# Altium PCB 16MV1.PcbDoc (part 2 of 3)
Units mm, origin at the board's own origin, x right, y up, seen from the top; angles counter-clockwise.
Board outline 48 x 32 mm, 4 copper layers (Top Layer, Layer 1, Layer 2, Bottom Layer), stack 1.583 mm thick; 197 components, 152 nets, 778 pads, 395 vias.
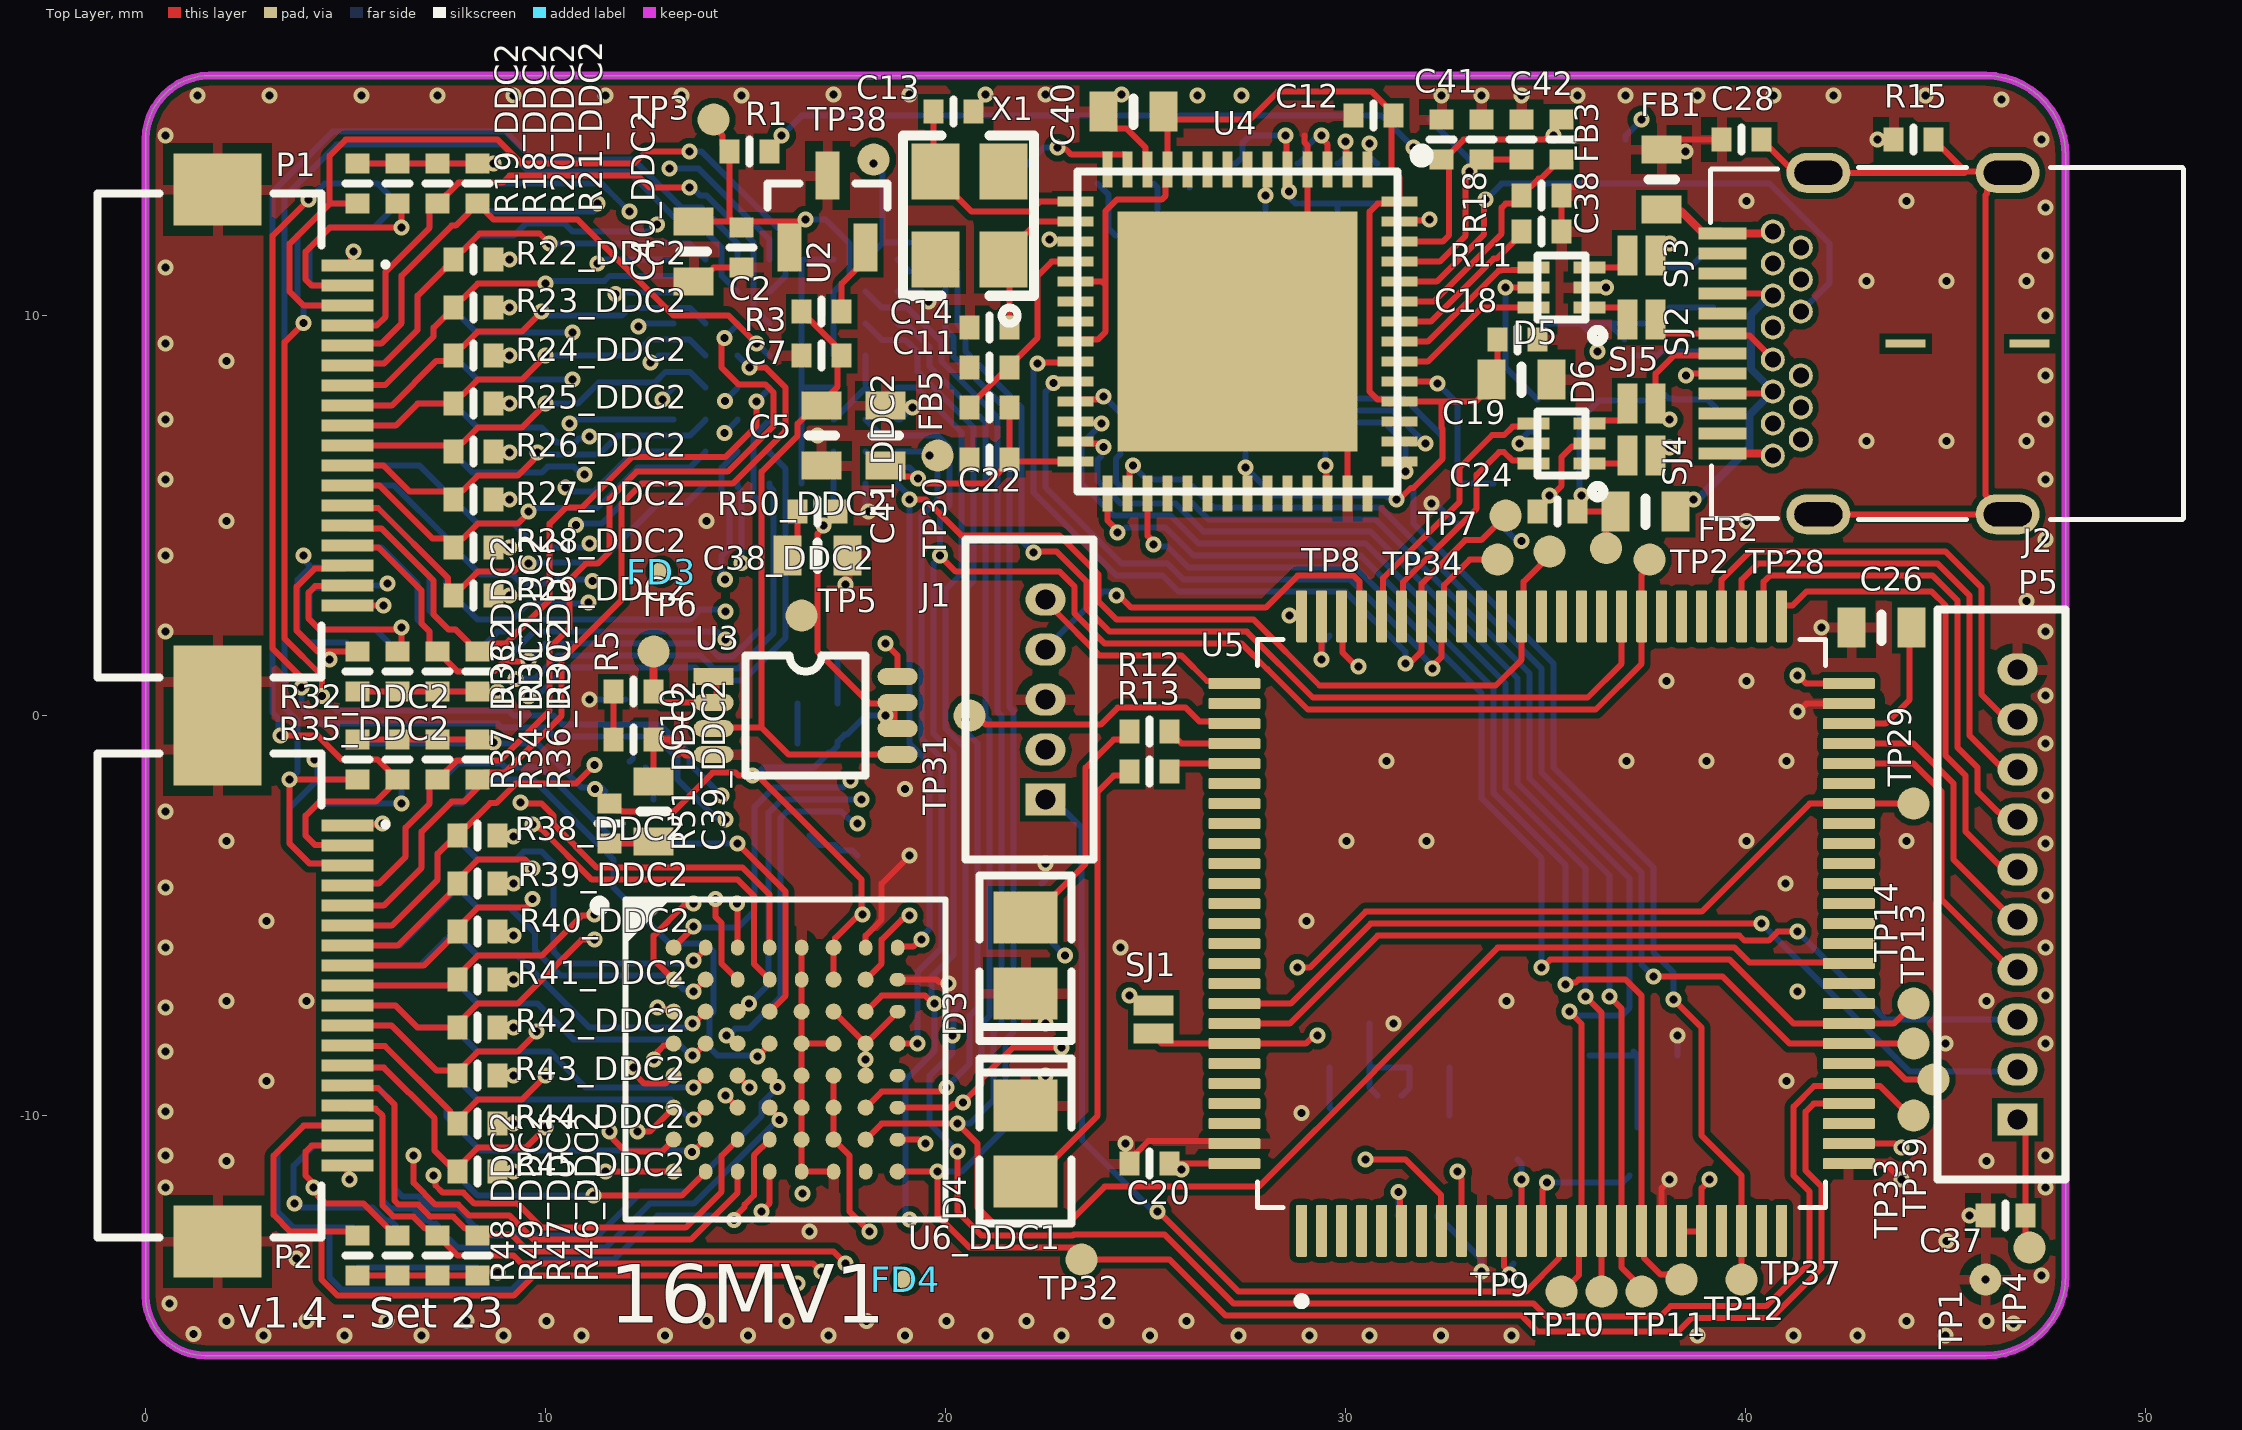
[diagram p0: Top Layer view]

## Via types
v1: diameter 0.4, hole 0.2, Top Layer to Bottom Layer, tented both sides, 395 vias

## Nets (pads, with @x,y where several pads share a name; then routed paths per layer and width w, separated by ;. In a path a pad name is that pad's centre, name@x,y a point inside that pad or via, vN(x,y) a via of type N, cw(c..) or ccw(c..) an arc to the next point about the centre after c; other vN are vias at no path point) (continued)
GND: (continued)
  other v1: 2.946,-15.5 4.975,-15.5 6.9,-15.5 8.952,-15.5 10.9,-15.5 12.987,-15.5 15.054,-15.5 17.076,-15.5 18.982,-15.5 21.001,-15.5 22.9,-15.5 25.113,-15.5 27.324,-15.5 29.102,-15.5 30.6,-15.5 32.381,-15.5 34.15,-15.5 38.8,-15.5 41.2,-15.5 42.8,-15.5 45,-15.5 1.198,-15.456 46.7,-15.2 2.028,-15.14 4.028,-15.14 6.028,-15.14 8.028,-15.14 10.028,-15.14 14.028,-15.14 16.028,-15.14 18.028,-15.14 20.028,-15.14 22.028,-15.14 24.028,-15.14 26.028,-15.14 44.028,-15.14 46.028,-15.14 0.6,-14.7 46,-14.1 47.4,-14 3.768,-13.577 45.028,-13.14 16.6,-12.9 0.5,-11.8 47.5,-11.8 2.028,-11.14 46.028,-11.14 0.5,-11 47.5,-11 28.9,-9.935 0.5,-9.9 3.028,-9.14 41.028,-9.14 0.5,-8.4 45,-8.2 47.5,-8.2 31.2,-7.7 0.5,-7.3 2.028,-7.14 4.028,-7.14 34.028,-7.14 46.028,-7.14 47.5,-7 41.3,-6.9 0.5,-5.8 24.375,-5.798 47.5,-5.8 3.028,-5.14 29.028,-5.14 47.5,-4.5 0.5,-4.3 41,-4.2 47.5,-3.2 2.028,-3.14 30.028,-3.14 32.028,-3.14 40.028,-3.14 44.028,-3.14 0.5,-2.4 47.5,-2 18.982,-1.829 31.028,-1.14 37.028,-1.14 39.028,-1.14 41.028,-1.14 47.5,-0.7 47.5,0.5 38.028,0.86 40.028,0.86 0.5,2.1 47.5,2.1 41.9,2.2 47.028,2.86 17.5,3.274 0.5,4 47.5,4.4 2.028,4.86 14.028,4.86 40.028,4.86 0.5,5.9 47.5,5.9 43.028,6.86 45.028,6.86 47.028,6.86 0.5,7.4 47.5,7.4 47.5,8.5 2.028,8.86 0.5,9.3 47.5,10 43.028,10.86 45.028,10.86 47.028,10.86 0.5,11.2 47.5,11.5 47.5,12.7 40.028,12.86 44.028,12.86 38.5,14.1 47.4,14.4 0.5,14.5 46.4,15.4 1.3,15.5 3.1,15.5 5.4,15.5 7.3,15.5 9.2,15.5 11.5,15.5 13.4,15.5 14.9,15.5 26.3,15.5 27.4,15.5 32.4,15.5 33.4,15.5 34.4,15.5 35.8,15.5 37,15.5 38.8,15.5 40.7,15.5 42.2,15.5 44.5,15.5 17.2,15.525 19.1,15.525 20.997,15.525 22.5,15.525 24.4,15.525
I2C1_SCL: P5.2@46.8,-8.85 U5.92 | length 21.8
  Top Layer w0.15: U5.92@27.22,-7.2 28.624,-7.2 30.624,-5.2 39.024,-5.2 v1(40.4,-5.2)
  Bottom Layer w0.15: v1(40.4,-5.2) 44.1,-8.9 P5.2@46.7,-8.9
I2C1_SDA: P5.3 U5.93 | length 21.5
  Top Layer w0.15: U5.93@27.22,-7.7 28.6,-7.7 30.8,-5.5 39.849,-5.5 39.974,-5.625 40.576,-5.625 40.801,-5.4 v1(41.3,-5.4)
  Bottom Layer w0.15: v1(41.3,-5.4) 43.5,-7.6 P5.3@46.8,-7.6
JTCK/SWCLK: J1.5 U5.76 | length 5.5
  Top Layer w0.15: J1.5@22.659,3 J1.5@22.674,3 ; J1.5@22.7,2.8 22.7,2.651 23.851,1.5 25.9,1.5 26.535,0.865 27.155,0.865 U5.76@27.22,0.8
JTMS/SWDIO: J1.4 U5.72 | length 9.6
  Top Layer w0.15: v1(24.275,3) 24.343,3 24.643,2.7 28,2.7 28.8,3.5 30.2,3.5 30.351,3.349 30.351,2.529 U5.72@30.4,2.48
  Bottom Layer w0.15: J1.4@22.716,1.892 23.924,3.1 24.132,3.1 24.232,3 v1(24.275,3)
NetC5_1: C5.1 C7.1 R3.1 U3.3 U3.5 | length 16.1
  Top Layer w0.15: U3.3@14.4,-0.3 15.4,-0.3 ; R3.1@16.4,10.05 16.575,9.875 16.625,9.875 17.225,9.275 17.225,9.225 17.35,9.1 C7.1@17.4,9.1 ; C5.1@16.9,7.75 16.75,7.75 16.3,7.3 16.3,7 15.4,6.1 15.4,-0.3 ; C5.1@16.9,7.95 17.025,7.95 17.3,8.225 17.3,8.9 C7.1@17.4,9 ; U3.5@18.725,-0.975 16.075,-0.975 15.4,-0.3
NetC9_1: C9.1 R4.1 | length 1
  Bottom Layer w0.15: R4.1@16.3,-0.7 C9.1@16.3,0.3
NetC10_1: C10.1 R5.1 | length 1.2
  Top Layer w0.15: C10.1@11.7,-0.6 R5.1@11.7,0.6
NetC11_1: C11.1 FB5.1 U4.18 | length 5
  Top Layer w0.15: FB5.1@20.7,7.8 20.7,7.85 22.3,9.45 22.3,11 22.65,11.35 U4.18@23.25,11.35
NetC13_2: C13.2 U4.15 X1.3 | length 4.7
  Top Layer w0.15: X1.3@19.6,13.9 19.7,14 C13.2@19.7,15.1 ; X1.3@20.1,13 20.25,13 20.65,12.6 22.1,12.6 22.35,12.85 U4.15@23.25,12.85
NetC14_2: C14.2 U4.16 X1.1 | length 3.2
  Top Layer w0.15: X1.1@21.5,11.2 21.6,11.1 C14.2@21.6,9.7 ; X1.1@21.8,11.8 21.8,11.85 22.3,12.35 U4.16@23.25,12.35
NetC15_1: C15.1 U5.8 X2.2 | length 4.3
  Top Layer w0.15: v1(30.5,-11.1) 31.5,-11.1 32.381,-11.981 32.381,-12.861 U5.8@32.4,-12.88
  Bottom Layer w0.15: C15.1@29.6,-8.8 29.6,-9.8 X2.2@29.7,-9.9
NetC16_1: C16.1 U5.9 X2.1 | length 2.7
  Top Layer w0.15: v1(32.8,-11.4) 32.8,-11.468 32.9,-11.568 U5.9@32.9,-12.88
  Bottom Layer w0.15: X2.1@32.6,-10 C16.1@32.6,-8.8
NetC26_2: C26.2 U5.48 | length 3.6
  Top Layer w0.15: U5.48@42.58,-0.2 43.5,-0.2 44.1,0.4 C26.2@44.1,2.2
NetC27_2: C27.2 U5.73 | length 1.5
  Top Layer w0.15: U5.73@29.9,2.48 29.919,2.461 29.919,1.581 30.275,1.225 v1(30.325,1.225)
NetC28_1: C28.1 J2.Shell R15.2 | length 19.7
  Top Layer w0.15: C28.1@40.4,14.4 40.4,14.35 40.575,14.175 40.625,14.175 41.1,13.7 J2.Shell@41.1,13.6 ; J2.Shell@41.82,5.03 46.17,5.03 J2.Shell@46.2,5 ; J2.Shell@41.82,13.57 45.47,13.57 45.5,13.6 ; R15.2@44.7,14.4 44.7,14.35 44.875,14.175 44.925,14.175 45.5,13.6 ; J2.Shell@46.1,5.2 46.1,5.41 46,5.51 46,13.02 46.037,13.057 46.037,13.127 46.48,13.57 J2.Shell@46.55,13.57 ; J2.Shell@46.2,13.6 45.5,13.6
NetC29_2: C29.2 U5.12 X3.3 | length 2.5
  Top Layer w0.15: U5.12@34.4,-12.88 v1(34.4,-11.6)
  Bottom Layer w0.15: X3.3@34.3,-11.1 34.4,-11.2 v1(34.4,-11.6) C29.2@34.4,-12.3
NetC30_2: C30.2 R14.2 X3.1 | length 3.1
  Bottom Layer w0.15: X3.1@36.1,-8.5 C30.2@37.3,-8.5 ; C30.2@37.2,-8.4 C30.2@37.3,-8.5 ; R14.2@37.3,-10.3 C30.2@37.3,-8.5
NetC38_1: C38.1 FB3.1 U4.51 | length 5.6
  Top Layer w0.15: U4.51@31.35,10.35 32.2,10.35 33.9,12.05 33.9,12.7 34,12.8 C38.1@34.3,12.8 ; C38.1@34.4,13 34.4,13.05 34.575,13.225 34.625,13.225 34.825,13.425 34.875,13.425 35.25,13.8 FB3.1@35.3,13.8
NetC38_DDC1_1: C38_DDC1.1 R50_DDC1.1 | length 1
  Bottom Layer w0.15: C38_DDC1.1@12.1,-1.15 C38_DDC1.1@12.187,-1.063 ; C38_DDC1.1@12.5,-1.3 12.625,-1.425 12.625,-1.438 12.7,-1.513 R50_DDC1.1@12.7,-2.1
NetC38_DDC2_1: C38_DDC2.1 R50_DDC2.1 | length 0.8
  Top Layer w0.15: C38_DDC2.1@16.2,4.3 16.3,4.4 R50_DDC2.1@16.3,5.1
NetC39_1: C39.1 FB4.1 U4.47 | length 4.4
  Top Layer w0.15: U4.47@31.35,8.35 32.182,8.35 32.2,8.332 v1@32.2,8.3
  Bottom Layer w0.15: v1(32.3,8.3) 32.8,7.8 C39.1@32.8,5.9 ; C39.1@32.8,5.8 FB4.1@33.7,5.8
NetC39_DDC1_1: C39_DDC1.1 R51_DDC1.1 | length 1.4
  Bottom Layer w0.15: C39_DDC1.1@16.599,-3 16.833,-3.234 17.234,-3.234 17.375,-3.375 17.675,-3.375 R51_DDC1.1@17.8,-3.5
NetC39_DDC2_1: C39_DDC2.1 R51_DDC2.1 | length 1
  Top Layer w0.15: R51_DDC2.1@11.6,-3.2 C39_DDC2.1@12.6,-3.2
NetD1_2: D1.2 R7.1 | length 1.5
  Bottom Layer w0.15: D1.2@23.8,13.3 24.075,13.025 24.075,12.175 24.25,12 R7.1@24.3,12
NetD1_3: D1.3 R6.1 | length 1.5
  Bottom Layer w0.15: D1.3@25.05,13.3 25.2,13.3 25.3,13.2 R6.1@25.3,12
NetD3_1: D3.1 R12.1 | length 5.7
  Top Layer w0.15: D3.1@22,-5.05 22.15,-5.05 22.725,-4.475 23.5,-3.7 23.5,-1.3 24.2,-0.6 R12.1@24.5,-0.6